# Altium PCB 1712_Mez.PcbDoc
Units mm, origin at the board's own origin, x right, y up, seen from the top; angles counter-clockwise.
Board outline 78 x 78 mm, 2 copper layers (Top Layer, Bottom Layer); 6 components, 15 nets, 94 pads, 138 vias.
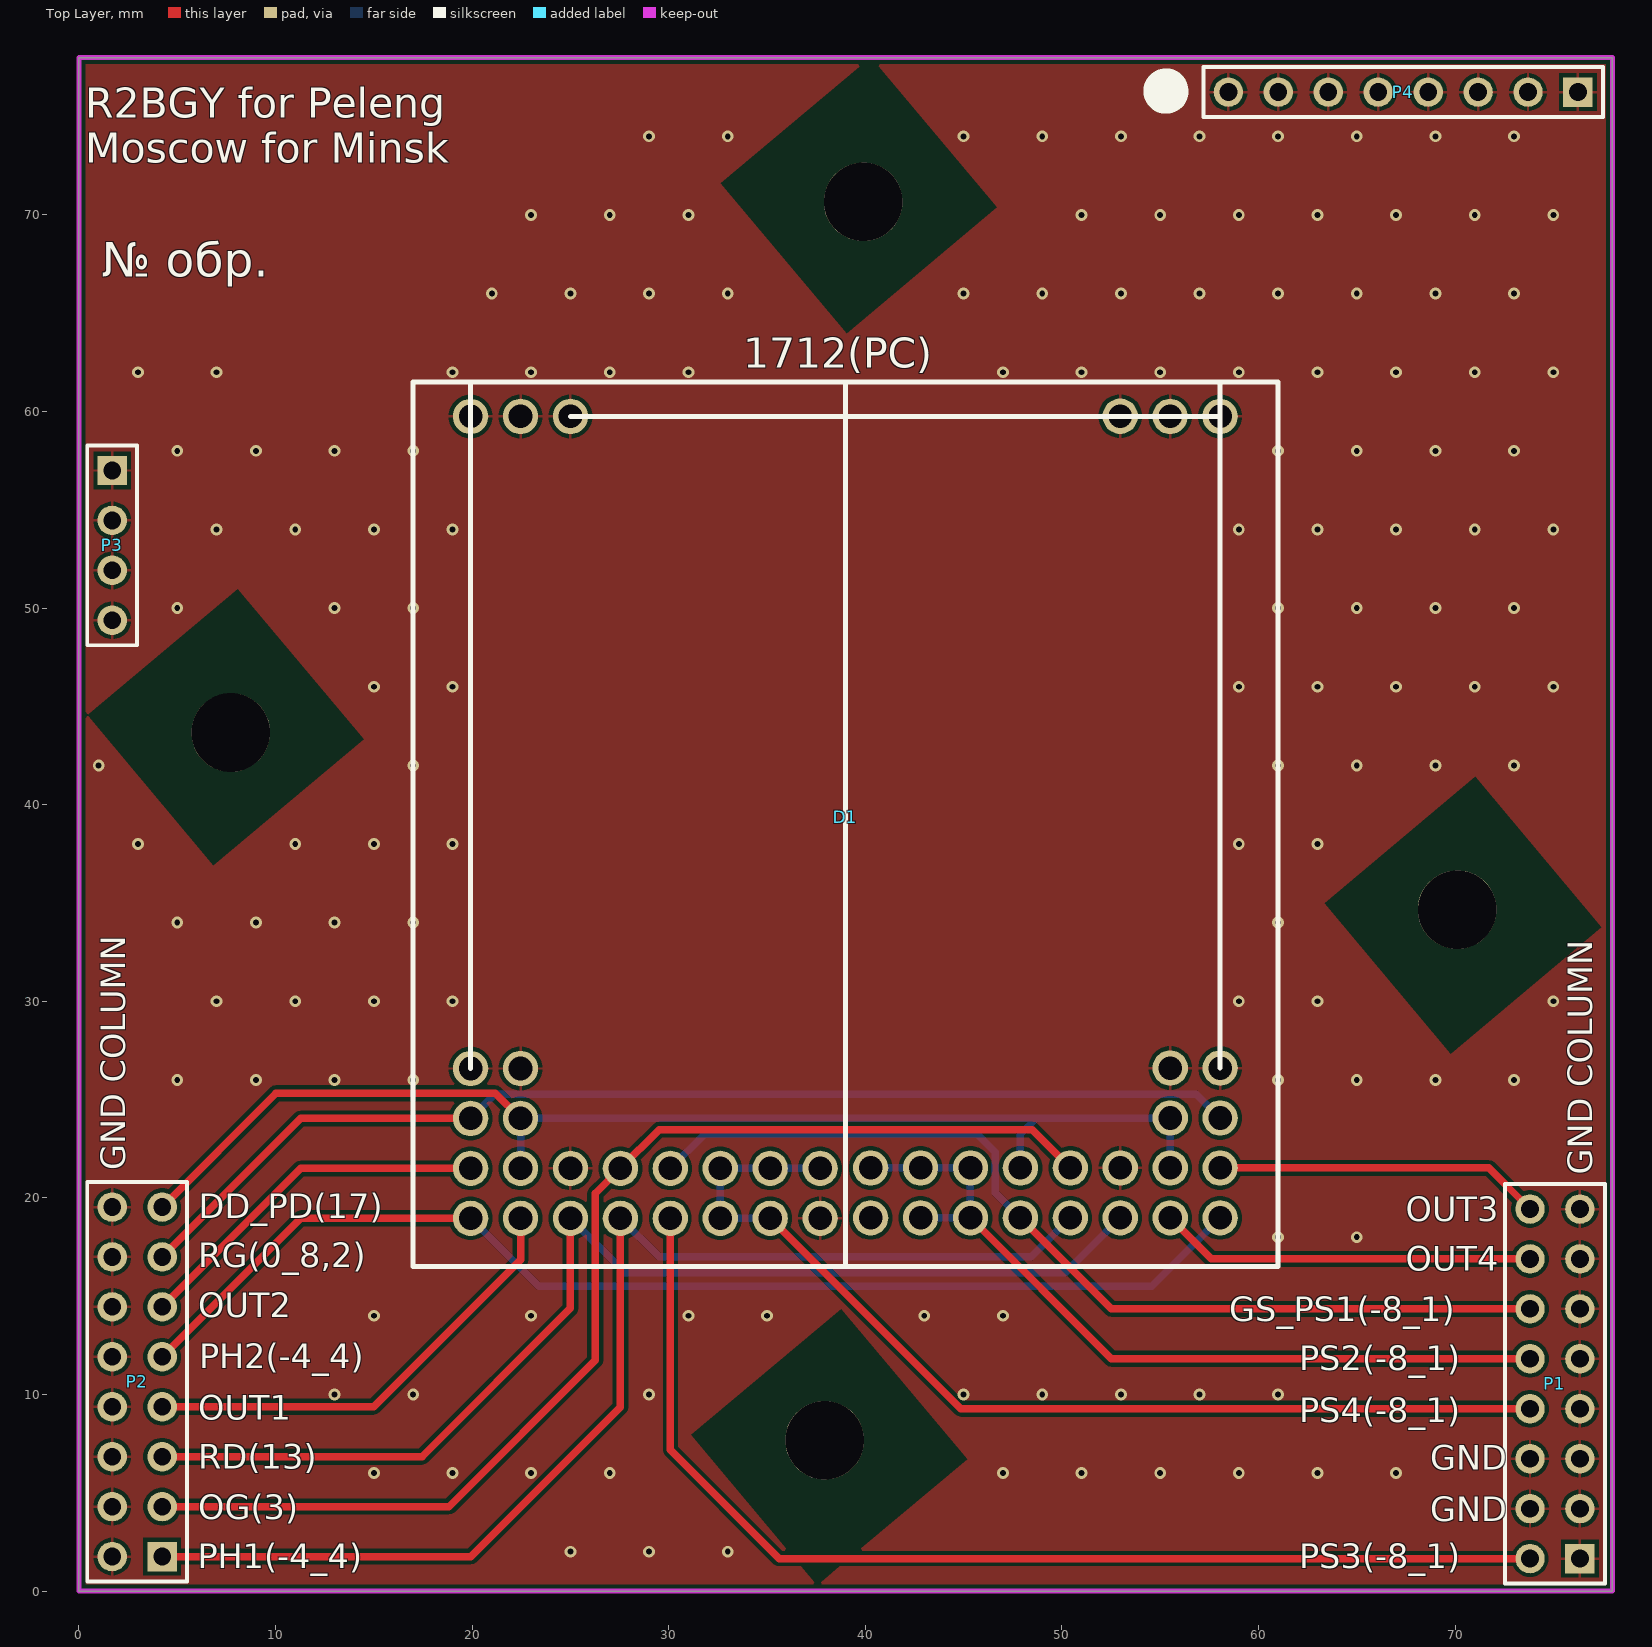
[diagram p0: Top Layer view]
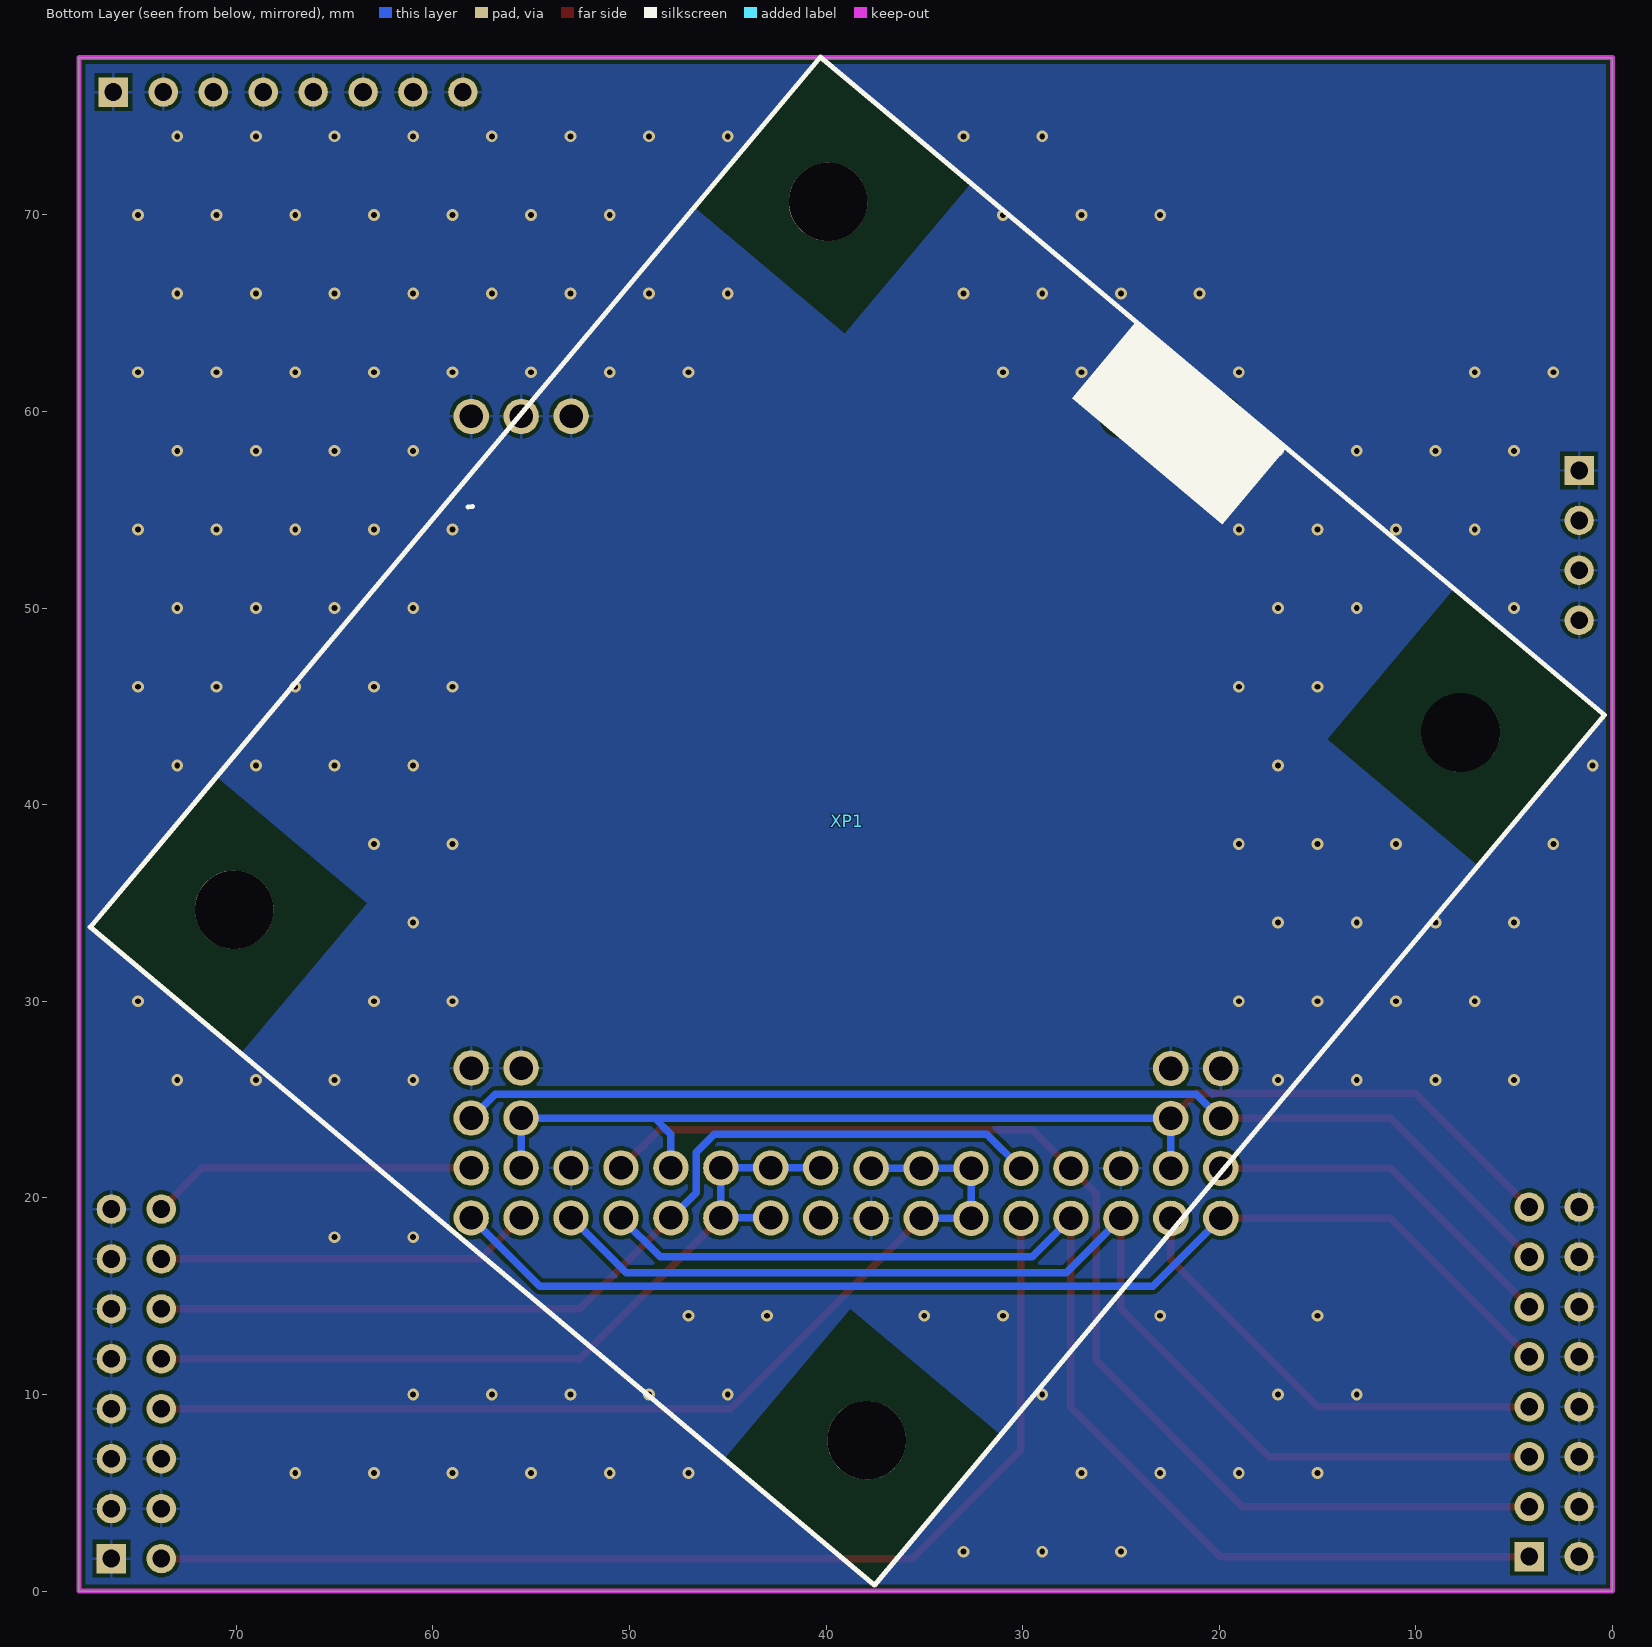
[diagram p1: Bottom Layer view, seen from below]

## Layer stack, top to bottom
Top Solder: solder mask 0.0102, Solder Resist, Dk 3.5
Top Layer: signal copper 0.0356
Dielectric 1: dielectric 0.32, FR-4, Dk 4.8
Bottom Layer: signal copper 0.0356
Bottom Solder: solder mask 0.0102, Solder Resist, Dk 3.5

## Board outline
0,0 78,0 78,78 0,78

## Design rules (kind name [scope] priority, off if disabled: settings)
BoardOutlineClearance [OnLayer('Multi-Layer')] p1: gap=0.254 ignorepadtopadclearanceinfootprint=FALSE except(0: Arc-SplitContinuation Track-SplitContinuation SMDPad-SplitContinuation THPad-SplitContinuation Via-SplitContinuation Fill-SplitContinuation Poly-SplitContinuation Region-SplitContinuation Text-SplitContinuation; 0.4: Arc-OutlineEdge Track-OutlineEdge SMDPad-OutlineEdge THPad-OutlineEdge Via-OutlineEdge Fill-OutlineEdge Poly-OutlineEdge Region-OutlineEdge Text-OutlineEdge)
Clearance [All] p1: gap=0.125 ignorepadtopadclearanceinfootprint=FALSE except(0.2: Arc-Fill Arc-Poly Track-Fill Track-Poly SMDPad-Fill SMDPad-Poly THPad-Fill THPad-Poly Via-Fill Via-Poly Fill-Fill Fill-Poly Poly-Poly Poly-Region Poly-Text; 0.25: Arc-Hole Track-Hole SMDPad-Hole THPad-Hole Via-Hole Fill-Hole Poly-Hole Region-Hole Text-Hole) // Standart
DiffPairsRouting [All] p1: maxlimit=0.254 minlimit=0.127 mostfreqgap=0.13 toplayer_minwidth=0.127 toplayer_maxwidth=0.381 toplayer_prefwidth=0.37 bottomlayer_minwidth=0.127 bottomlayer_maxwidth=0.381 bottomlayer_prefwidth=0.37 maxuncoupledlength=12.7
HoleSize [All] p1: absolutevalues=TRUE maxlimit=5 minlimit=0.3 maxpercent=80.000 minpercent=20.000
MinimumSolderMaskSliver [All] p1: minsoldermaskwidth=0.1
PlaneClearance "PlaneClearance-1 1/2 Oz" [All] p1: clearance=0.2 // Standart
PlaneConnect "TermalConnect-1 1/2 Oz" [All] p1: planeconnectstyle=Relief reliefexpansion=0.2 reliefentries=4 reliefconductorwidth=0.2 reliefairgap=0.2 // Standart
PolygonConnect "PolygonConnect-1 1/2 Oz" [All] p1: thpad.connectstyle=Relief thpad.reliefconductorwidth=0.15 thpad.reliefentries=4 thpad.polygonreliefangle="90 Angle" thpad.airgapwidth=0.2 smdpad.connectstyle=Relief smdpad.reliefconductorwidth=0.2 smdpad.reliefentries=4 smdpad.polygonreliefangle="90 Angle" smdpad.airgapwidth=0.2 via.connectstyle=Direct via.reliefconductorwidth=0.254 via.reliefentries=4 via.polygonreliefangle="90 Angle" via.airgapwidth=0.254 // Standart
RoutingVias [All] p1: holewidth=0.3 width=1.27 viastyle="Through Hole" minholewidth=0.3 minwidth=0.6 maxholewidth=0.711 maxwidth=1.27
SilkToSilkClearance [All] p1: silktosilkclearance=0
SilkToSolderMaskClearance [IsPad] p1: minsilkscreentomaskgap=0 clearancetoexposedcopper=TRUE
SolderMaskExpansion [All] p1: expansion=0.102 istentingtop=FALSE
UnRoutedNet [All] p1: checkbadconnections=TRUE
Width [All] p1: maxlimit=2.5 minlimit=0.125 preferedwidth=0.37
22 further rules are at their usual default settings.

## Components (designator, comment, footprint, x,y, rotation, side; value= is the part's Value field where it differs from the comment)
D1 "1712(PC)" Dzr_place 17,16.496 r0 top
P1 "Header 8X2" HDR2X8 76.352,1.651 r90 top
P2 "Header 8X2" HDR2X8 4.23,1.753 r90 top
P3 "Header 4" HDR1X4 1.69,57 r270 top
P4 "Header 8" HDR1X8 76.251,76.251 r180 top
XP1 "Грелка" Грелка 38.913,39.167 r310 bottom

## Footprints (in the part's own frame and the unit in brackets; to place one, negate y for a bottom-side part, rotate by r counter-clockwise, add the part's x,y. Pads: shape width x height; smd on the part's side, far side on the other; paste and mask are expansions set on the pad)
Dzr_place [mm]
  round 1.8 hole 1.2: P1(41.05,10.105) P2(38.51,10.105) P15(5.461,10.084) P16(2.921,10.084) R1(41.05,7.565) R2(38.51,7.565) R15(5.461,7.544) R16(2.921,7.544) S1(41.05,5.025) S2(38.51,5.025) S3(35.97,5.025) S4(33.43,5.025) S5(30.89,5.025) S6(28.35,5.025) S7(25.81,5.025) S8(23.27,5.025) S9(20.701,5.004) S10(18.161,5.004) S11(15.621,5.004) S12(13.081,5.004) S13(10.541,5.004) S14(8.001,5.004) S15(5.461,5.004) S16(2.921,5.004) T1(41.05,2.485) T2(38.51,2.485) T3(35.97,2.485) T4(33.43,2.485) T5(30.89,2.485) T6(28.35,2.485) T7(25.81,2.485) T8(23.27,2.485) T9(20.701,2.464) T10(18.161,2.464) T11(15.621,2.464) T12(13.081,2.464) T13(10.541,2.464) T14(8.001,2.464) T15(5.461,2.464) T16(2.921,2.464) ""(2.921,43.256) ""(5.461,43.256) ""(8.001,43.256) ""(35.966,43.265) ""(38.506,43.256) ""(41.046,43.256)
  silkscreen extent 0,0 44,45.01
HDR1X4 [mm] "Connector; Header; 4 Position"
  rect 1.5x1.5 hole 0.9: 1(0,0)
  round 1.5 hole 0.9: 2(2.54,0) 3(5.08,0) 4(7.62,0)
  silkscreen extent -1.27,-1.27 8.89,1.27
HDR1X8 [mm] "Connector; Header; 8 Position"
  rect 1.5x1.5 hole 0.9: 1(0,0)
  round 1.5 hole 0.9: 2(2.54,0) 3(5.08,0) 4(7.62,0) 5(10.16,0) 6(12.7,0) 7(15.24,0) 8(17.78,0)
  silkscreen extent -1.27,-1.27 19.05,1.27
HDR2X8 [mm] "Connector; Header; 8x2 Position"
  rect 1.5x1.5 hole 0.9: 1(0,0)
  round 1.5 hole 0.9: 2(0,2.54) 3(2.54,0) 4(2.54,2.54) 5(5.08,0) 6(5.08,2.54) 7(7.62,0) 8(7.62,2.54) 9(10.16,0) 10(10.16,2.54) 11(12.7,0) 12(12.7,2.54) 13(15.24,0) 14(15.24,2.54) 15(17.78,0) 16(17.78,2.54)
  silkscreen extent -1.27,-1.27 19.05,3.81
Грелка [mm]
  round 4 hole 4 unplated: 0(-23.5,21) 0(-23.5,-21) 0(23.5,21) 0(23.5,-21)
  silkscreen extent -28.89,-26.04 28.89,26.04

## Part data
D1: library part Б1712А-3
P1 P2: "Header, 8-Pin, Dual row", LatestRevisionDate=17-Jul-2002, LatestRevisionNote="Re-released for DXP Platform.", Publisher="Altium Limited"
P3: "Header, 4-Pin", LatestRevisionDate=17-Jul-2002, LatestRevisionNote="Re-released for DXP Platform.", Publisher="Altium Limited"
P4: "Header, 8-Pin", LatestRevisionDate=17-Jul-2002, LatestRevisionNote="Re-released for DXP Platform.", Publisher="Altium Limited"

## Via types
v1: diameter 0.6, hole 0.3, Top Layer to Bottom Layer, 138 vias

## Nets (pads, with @x,y where several pads share a name; then routed paths per layer and width w, separated by ;. In a path a pad name is that pad's centre, name@x,y a point inside that pad or via, vN(x,y) a via of type N, cw(c..) or ccw(c..) an arc to the next point about the centre after c; other vN are vias at no path point)
3V: D1.S4 D1.S13 P2.3 | length 59.9
  Top Layer w0.381: P2.3 18.821,4.293 26.264,11.735 26.264,20.222 D1.S13 29.511,23.47 48.481,23.47 D1.S4
GND: D1. D1.P1 D1.P2 D1.P15 D1.P16 D1.S3 D1.S14 D1.T9 P1.1 P1.3 P1.4 P1.5 P1.6 P1.7 P1.9 P1.11 P1.13 P1.15 P2.2 P2.4 P2.6 P2.8 P2.10 P2.12 P2.14 P2.16 P3.1 P3.2 P3.3 P3.4 P4.1 P4.2 P4.3 P4.4 P4.5 P4.6 P4.7 P4.8
  other v1: 25,2 29,2 33,2 15,6 19,6 23,6 27,6 47,6 51,6 55,6 59,6 63,6 67,6 13,10 17,10 29,10 45,10 49,10 53,10 57,10 61,10 15,14 23,14 31,14 35,14 43,14 47,14 61,18 65,18 5,26 9,26 13,26 17,26 61,26 65,26 69,26 73,26 7,30 11,30 15,30 19,30 59,30 63,30 75,30 5,34 9,34 13,34 17,34 61,34 3,38 11,38 15,38 19,38 59,38 63,38 1,42 17,42 61,42 65,42 69,42 73,42 15,46 19,46 59,46 63,46 67,46 71,46 75,46 5,50 13,50 17,50 61,50 65,50 69,50 73,50 7,54 11,54 15,54 19,54 59,54 63,54 67,54 71,54 75,54 5,58 9,58 13,58 17,58 61,58 65,58 69,58 73,58 3,62 7,62 19,62 23,62 27,62 31,62 47,62 51,62 55,62 59,62 63,62 67,62 71,62 75,62 21,66 25,66 29,66 33,66 45,66 49,66 53,66 57,66 61,66 65,66 69,66 73,66 23,70 27,70 31,70 51,70 55,70 59,70 63,70 67,70 71,70 75,70 29,74 33,74 45,74 49,74 53,74 57,74 61,74 65,74 69,74 73,74
GS_PS1: D1.S12 D1.T5 P1.12 | length 49.6
  Top Layer w0.381: D1.T5 52.52,14.351 P1.12@74.1,14.351
  Bottom Layer w0.381: D1.S12 31.823,23.241 45.695,23.241 46.609,22.327 46.609,20.262 D1.T5
OUT1: D1.T15 P2.7 | length 23.4
  Top Layer w0.381: P2.7 14.986,9.373 22.461,16.848 D1.T15
OUT2: D1.S16 P2.11 | length 18.6
  Top Layer w0.381: P2.11 11.277,21.499 D1.S16
OUT3: D1.S1 P1.16 | length 16.6
  Top Layer w0.381: D1.S1 71.722,21.521 P1.16
OUT4: D1.T2 P1.14 | length 19.2
  Top Layer w0.381: D1.T2 57.6,16.891 P1.14
PH1: D1.T4 D1.T13 P2.1 | length 60.6
  Top Layer w0.381: P2.1 19.939,1.753 27.541,9.355 D1.T13
  Bottom Layer w0.381: D1.T13 29.508,16.993 48.442,16.993 D1.T4
PH2: D1.T1 D1.T16 P2.9 | length 59.6
  Top Layer w0.381: P2.9 11.277,18.959 D1.T16
  Bottom Layer w0.381: D1.T16 23.386,15.494 54.563,15.494 D1.T1
PS2: D1.S6 D1.S7 D1.S8 D1.T6 D1.T7 P1.10 | length 41.6
  Top Layer w0.381: D1.T6 52.52,11.811 P1.10
  Bottom Layer w0.381: D1.S8 D1.S7 D1.S6 D1.T6 D1.T7
PS3: D1.T12 P1.2 | length 57.8
  Top Layer w0.381: D1.T12 30.081,7.181 35.611,1.651 P1.2
PS4: D1.S9 D1.S10 D1.S11 D1.T10 D1.T11 P1.8 | length 52.8
  Top Layer w0.381: D1.T10 44.849,9.271 P1.8
  Bottom Layer w0.381: D1.T10 D1.T11 D1.S11 D1.S10 D1.S9
RD: D1.T3 D1.T14 P2.5 | length 58.8
  Top Layer w0.381: P2.5 17.45,6.833 25.001,14.384 D1.T14
  Bottom Layer w0.381: D1.T14 27.781,16.18 50.169,16.18 D1.T3
RG: D1.R1 D1.R16 P2.13 | length 57.8
  Top Layer w0.381: P2.13 11.277,24.039 D1.R16
  Bottom Layer w0.381: D1.R16 21.155,25.273 23.114,25.273 23.118,25.277 56.834,25.277 D1.R1
VDD_PD: D1.R2 D1.R15 D1.S2 D1.S5 D1.S15 P2.15 | length 62.2
  Top Layer w0.381: P2.15 10.021,25.324 21.177,25.324 D1.R15
  Bottom Layer w0.381: D1.S15 D1.R15 ; D1.R15@22.483,24.061 48.724,24.061 ; D1.S5 47.89,23.227 48.724,24.061 ; D1.S2 D1.R2 48.724,24.061
pads on no net: D1.T8 XP1.0

## Polygon pours and split planes (outlines as drawn)
GND on Bottom Layer "GND_L02_P001" (solid, remove dead copper, pour order 1): 0,78 0,0 78,0 78,78
GND on Top Layer "GND_L01_P000" (solid, remove dead copper, pour order 0): 0,78 0,0 78,0 78,78

## Keep-outs
Keep-Out Layer:
  the board outline again, w0.254

## Other copper
Multi-Layer:
  pour cut-out: 38.774,14.368 45.202,6.707 37.541,0.279 31.113,7.94
  pour cut-out: 71.02,41.424 77.448,33.763 69.787,27.336 63.359,34.996
  pour cut-out: 40.279,78.042 46.707,70.382 39.047,63.954 32.619,71.614
  pour cut-out: 8.072,50.991 14.5,43.331 6.839,36.903 0.412,44.563

## Silkscreen, mask and mechanical layers (free items; w line width, h text height)
Top Overlay:
  lines w1.5: 55.677,76.429 ccw(c55.297,76.302) 55.697,76.302
  text "R2BGY for Peleng / Moscow for Minsk" at 0.318,72.648 h1.52
  text "№ обр." at 1.168,66.283 h3
  text "GND COLUMN" at 2.362,21.412 h1.25 r90
  text "GND COLUMN" at 76.98,21.169 h1.25 r90
  text "DD_PD(17)" at 6.096,18.953 h1.25
  text "OUT3" at 67.488,18.821 h1.25
  text "RG(0_8,2)" at 6.071,16.469 h1.25
  text "OUT4" at 67.488,16.282 h1.25
  text "OUT2" at 6.071,13.919 h1.25
  text "GS_PS1(-8_1)" at 58.522,13.721 h1.25
  text "PH2(-4_4)" at 6.121,11.333 h1.25
  text "PS2(-8_1)" at 62.073,11.232 h1.25
  text "OUT1" at 6.071,8.712 h1.25
  text "PS4(-8_1)" at 62.073,8.59 h1.25
  text "RD(13)" at 6.071,6.223 h1.25
  text "GND" at 68.737,6.172 h1.25
  text "OG(3)" at 6.071,3.658 h1.25
  text "GND" at 68.732,3.556 h1.25
  text "PH1(-4_4)" at 6.045,1.148 h1.25
  text "PS3(-8_1)" at 62.078,1.148 h1.25